# Altium PCB BOARD_2LAYER.PcbDoc (part 2 of 7)
Units mil, origin at the board's own origin, x right, y up, seen from the top; angles counter-clockwise.
Board outline 7677.17 x 7677.17 mil, 2 copper layers (Top Layer, Bottom Layer), stack 34.252 mil thick; 625 components, 375 nets, 1924 pads, 450 vias.
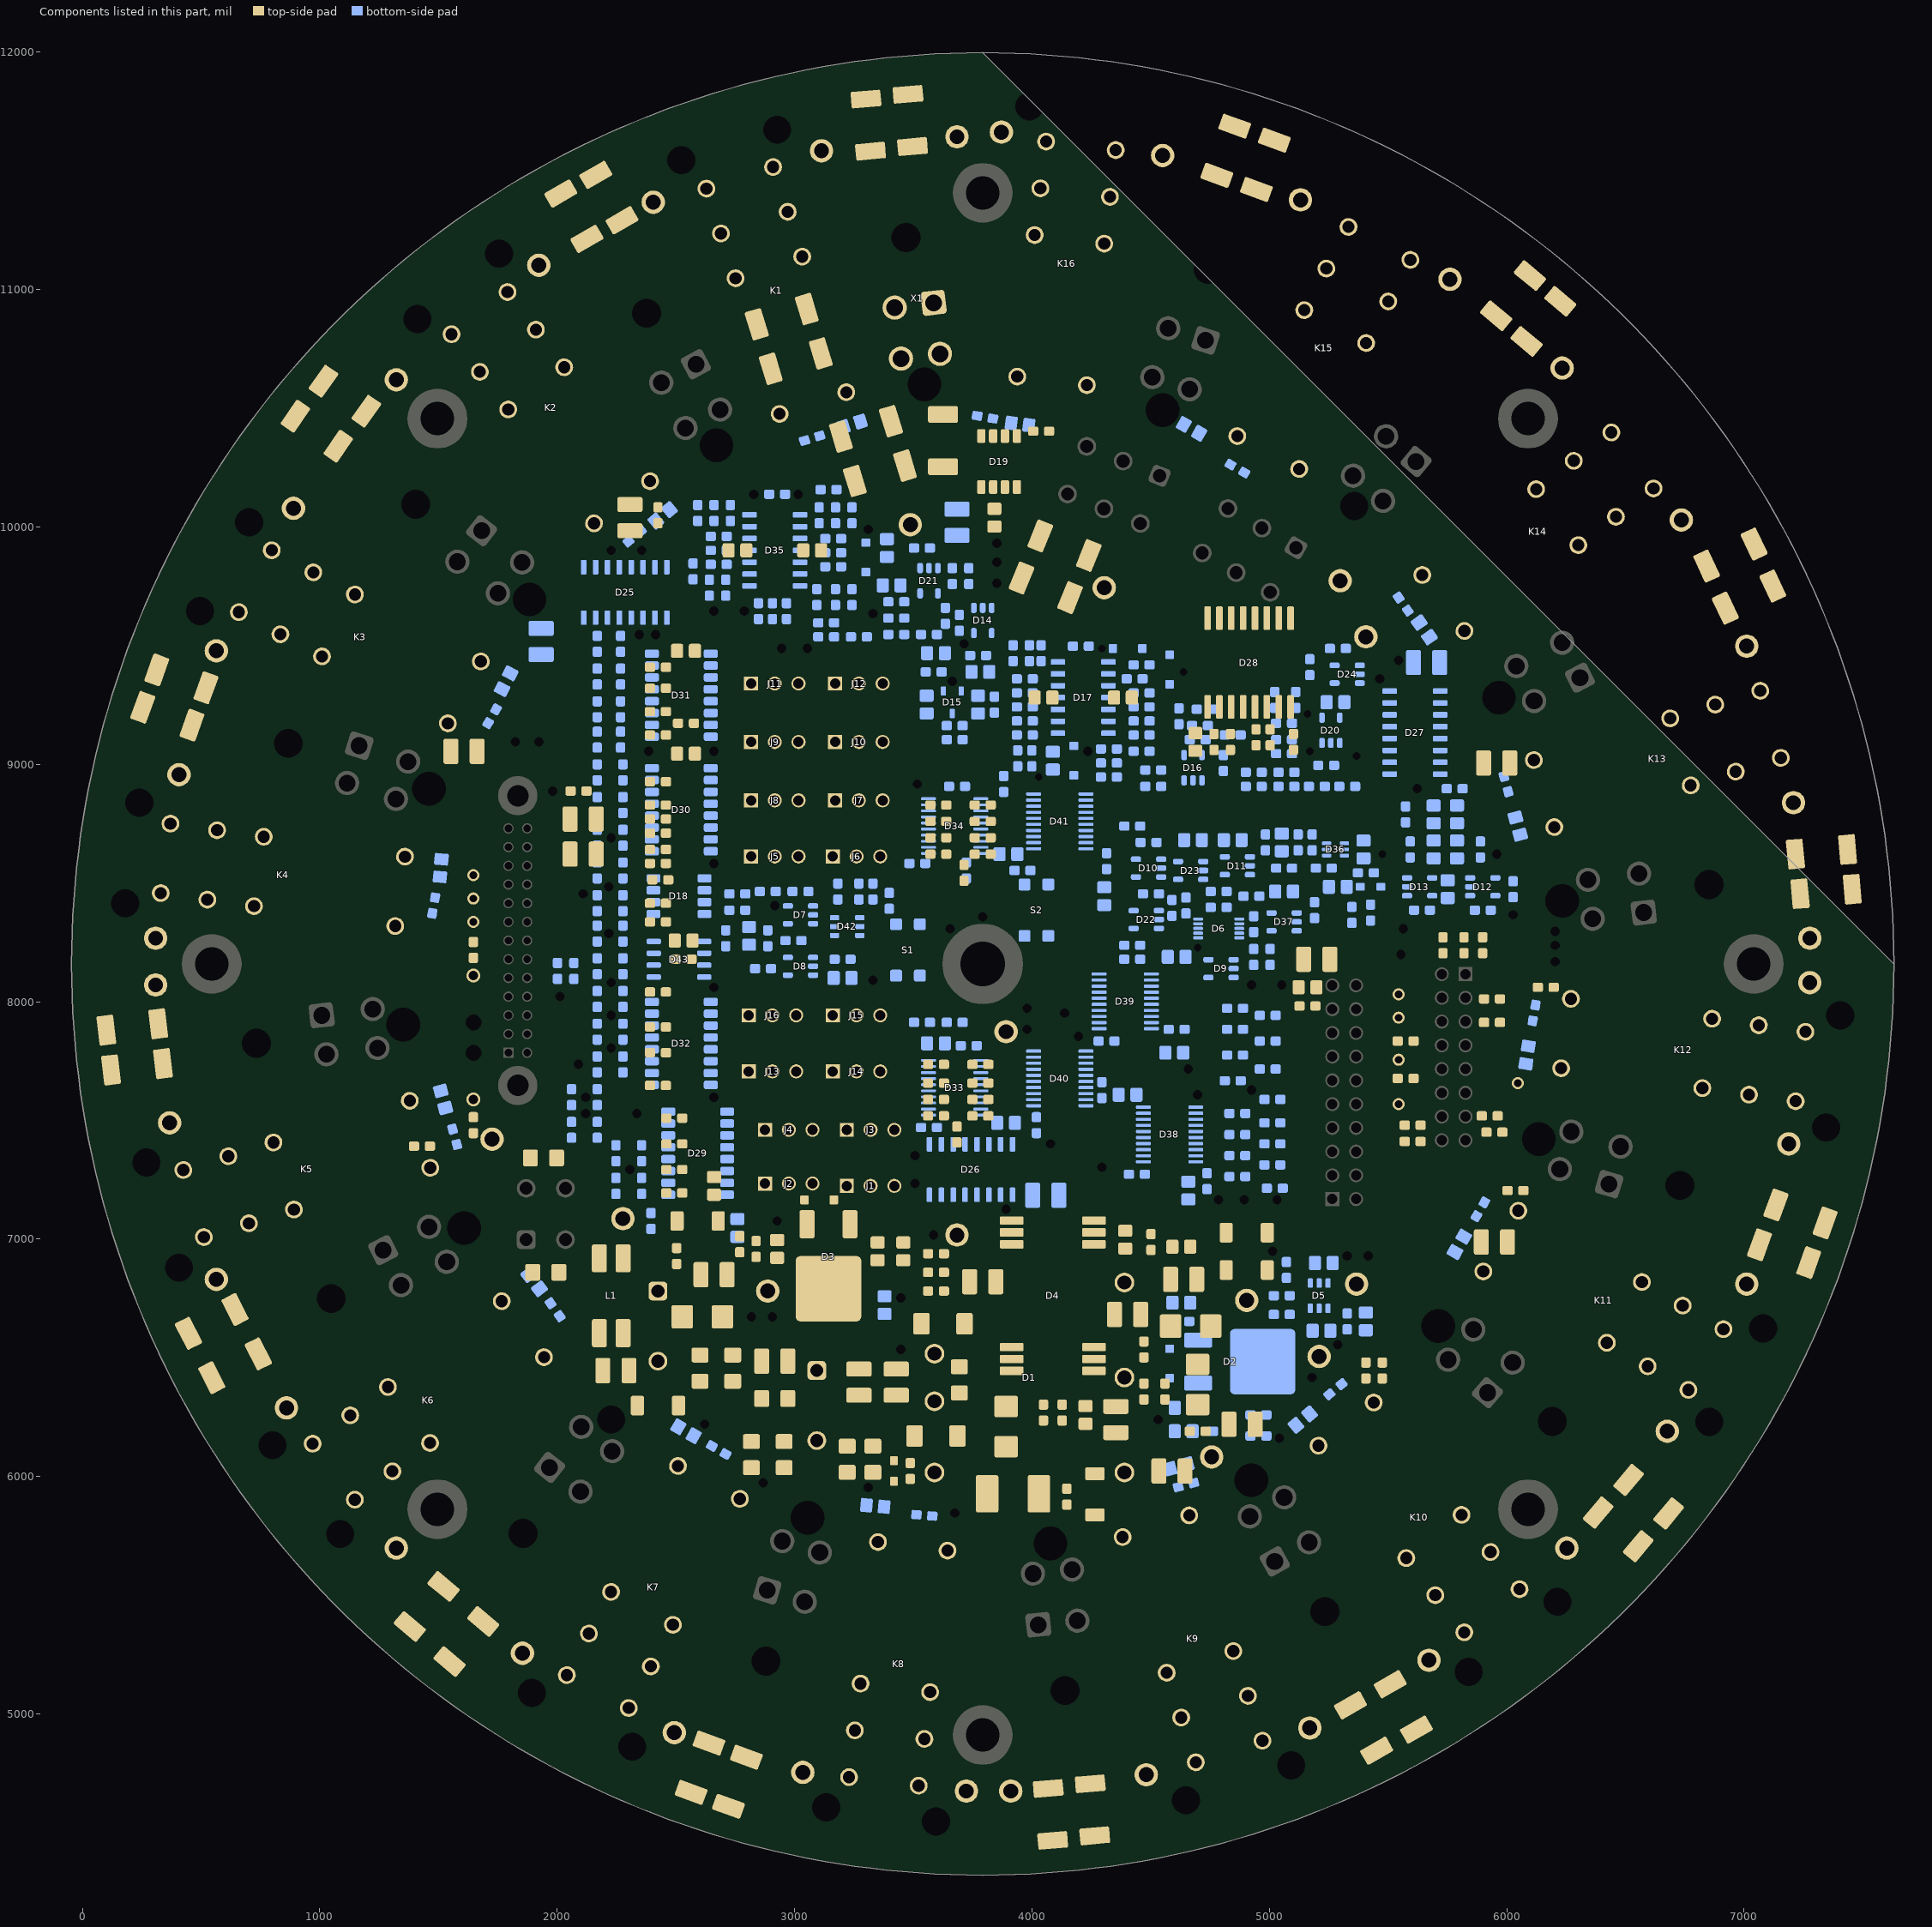
[diagram p2: the components of this part, seen from the top]

## Design rules (kind name [scope] priority, off if disabled: settings) (continued)
PolygonConnect PolygonConnect_In_-U_COM_L02_P091 [IsNamedPolygon('-U_COM_L02_P091')] p98: thpad.connectstyle=Relief thpad.reliefconductorwidth=19.68 thpad.reliefentries=4 thpad.polygonreliefangle="90 Angle" thpad.airgapwidth=19.68 smdpad.connectstyle=Relief smdpad.reliefconductorwidth=9.84 smdpad.reliefentries=4 smdpad.polygonreliefangle="90 Angle" smdpad.airgapwidth=9.84 via.connectstyle=Direct via.reliefconductorwidth=5.12 via.reliefentries=2 via.polygonreliefangle="90 Angle" via.airgapwidth=0
PolygonConnect PolygonConnect_In_$3N7061_L02_P084 [IsNamedPolygon('$3N7061_L02_P084')] p99: thpad.connectstyle=Relief thpad.reliefconductorwidth=19.68 thpad.reliefentries=4 thpad.polygonreliefangle="90 Angle" thpad.airgapwidth=19.68 smdpad.connectstyle=Relief smdpad.reliefconductorwidth=9.84 smdpad.reliefentries=4 smdpad.polygonreliefangle="90 Angle" smdpad.airgapwidth=9.84 via.connectstyle=Direct via.reliefconductorwidth=5.12 via.reliefentries=2 via.polygonreliefangle="90 Angle" via.airgapwidth=0
PolygonConnect PolygonConnect_In_GND_L01_P059 [IsNamedPolygon('GND_L01_P059')] p100: thpad.connectstyle=Relief thpad.reliefconductorwidth=19.68 thpad.reliefentries=4 thpad.polygonreliefangle="90 Angle" thpad.airgapwidth=19.68 smdpad.connectstyle=Relief smdpad.reliefconductorwidth=9.84 smdpad.reliefentries=4 smdpad.polygonreliefangle="90 Angle" smdpad.airgapwidth=9.84 via.connectstyle=Direct via.reliefconductorwidth=5.12 via.reliefentries=2 via.polygonreliefangle="90 Angle" via.airgapwidth=0
PolygonConnect PolygonConnect_In_GND_L01_P057 [IsNamedPolygon('GND_L01_P057')] p101: thpad.connectstyle=Relief thpad.reliefconductorwidth=19.68 thpad.reliefentries=4 thpad.polygonreliefangle="90 Angle" thpad.airgapwidth=19.68 smdpad.connectstyle=Relief smdpad.reliefconductorwidth=9.84 smdpad.reliefentries=4 smdpad.polygonreliefangle="90 Angle" smdpad.airgapwidth=9.84 via.connectstyle=Direct via.reliefconductorwidth=5.12 via.reliefentries=2 via.polygonreliefangle="90 Angle" via.airgapwidth=0
PolygonConnect PolygonConnect_In_-U_COM_L02_P099 [IsNamedPolygon('-U_COM_L02_P099')] p102: thpad.connectstyle=Relief thpad.reliefconductorwidth=19.68 thpad.reliefentries=4 thpad.polygonreliefangle="90 Angle" thpad.airgapwidth=19.68 smdpad.connectstyle=Relief smdpad.reliefconductorwidth=9.84 smdpad.reliefentries=4 smdpad.polygonreliefangle="90 Angle" smdpad.airgapwidth=9.84 via.connectstyle=Direct via.reliefconductorwidth=5.12 via.reliefentries=2 via.polygonreliefangle="90 Angle" via.airgapwidth=0
PolygonConnect PolygonConnect_In_GND_L01_P068 [IsNamedPolygon('GND_L01_P068')] p103: thpad.connectstyle=Relief thpad.reliefconductorwidth=19.68 thpad.reliefentries=4 thpad.polygonreliefangle="90 Angle" thpad.airgapwidth=19.68 smdpad.connectstyle=Relief smdpad.reliefconductorwidth=9.84 smdpad.reliefentries=4 smdpad.polygonreliefangle="90 Angle" smdpad.airgapwidth=9.84 via.connectstyle=Direct via.reliefconductorwidth=5.12 via.reliefentries=2 via.polygonreliefangle="90 Angle" via.airgapwidth=0
PolygonConnect PolygonConnect_In_GND_L01_P069 [IsNamedPolygon('GND_L01_P069')] p104: thpad.connectstyle=Relief thpad.reliefconductorwidth=19.68 thpad.reliefentries=4 thpad.polygonreliefangle="90 Angle" thpad.airgapwidth=19.68 smdpad.connectstyle=Relief smdpad.reliefconductorwidth=9.84 smdpad.reliefentries=4 smdpad.polygonreliefangle="90 Angle" smdpad.airgapwidth=9.84 via.connectstyle=Direct via.reliefconductorwidth=5.12 via.reliefentries=2 via.polygonreliefangle="90 Angle" via.airgapwidth=0
PolygonConnect PolygonConnect_In_GND_L01_P052 [IsNamedPolygon('GND_L01_P052')] p105: thpad.connectstyle=Relief thpad.reliefconductorwidth=19.68 thpad.reliefentries=4 thpad.polygonreliefangle="90 Angle" thpad.airgapwidth=19.68 smdpad.connectstyle=Relief smdpad.reliefconductorwidth=9.84 smdpad.reliefentries=4 smdpad.polygonreliefangle="90 Angle" smdpad.airgapwidth=9.84 via.connectstyle=Direct via.reliefconductorwidth=5.12 via.reliefentries=2 via.polygonreliefangle="90 Angle" via.airgapwidth=0
PolygonConnect PolygonConnect_In_GND_L01_P040 [IsNamedPolygon('GND_L01_P040')] p106: thpad.connectstyle=Relief thpad.reliefconductorwidth=19.68 thpad.reliefentries=4 thpad.polygonreliefangle="90 Angle" thpad.airgapwidth=19.68 smdpad.connectstyle=Relief smdpad.reliefconductorwidth=9.84 smdpad.reliefentries=4 smdpad.polygonreliefangle="90 Angle" smdpad.airgapwidth=9.84 via.connectstyle=Direct via.reliefconductorwidth=5.12 via.reliefentries=2 via.polygonreliefangle="90 Angle" via.airgapwidth=0
PolygonConnect PolygonConnect_In_~IN_COM_L02_P016 [IsNamedPolygon('~IN_COM_L02_P016')] p107: thpad.connectstyle=Relief thpad.reliefconductorwidth=19.68 thpad.reliefentries=4 thpad.polygonreliefangle="90 Angle" thpad.airgapwidth=19.68 smdpad.connectstyle=Relief smdpad.reliefconductorwidth=9.84 smdpad.reliefentries=4 smdpad.polygonreliefangle="90 Angle" smdpad.airgapwidth=9.84 via.connectstyle=Direct via.reliefconductorwidth=5.12 via.reliefentries=2 via.polygonreliefangle="90 Angle" via.airgapwidth=0
PolygonConnect PolygonConnect_In_-U_COM_L02_P100 [IsNamedPolygon('-U_COM_L02_P100')] p108: thpad.connectstyle=Relief thpad.reliefconductorwidth=19.68 thpad.reliefentries=4 thpad.polygonreliefangle="90 Angle" thpad.airgapwidth=19.68 smdpad.connectstyle=Relief smdpad.reliefconductorwidth=9.84 smdpad.reliefentries=4 smdpad.polygonreliefangle="90 Angle" smdpad.airgapwidth=9.84 via.connectstyle=Direct via.reliefconductorwidth=5.12 via.reliefentries=2 via.polygonreliefangle="90 Angle" via.airgapwidth=0
PolygonConnect "PolygonConnect_InClass_\"(Inherited)\"" [InPolygonClass('"(Inherited)"')] p109: thpad.connectstyle=Relief thpad.reliefconductorwidth=19.68 thpad.reliefentries=4 thpad.polygonreliefangle="90 Angle" thpad.airgapwidth=19.68 smdpad.connectstyle=Relief smdpad.reliefconductorwidth=9.84 smdpad.reliefentries=4 smdpad.polygonreliefangle="90 Angle" smdpad.airgapwidth=9.84 via.connectstyle=Direct via.reliefconductorwidth=5.12 via.reliefentries=2 via.polygonreliefangle="90 Angle" via.airgapwidth=0
PolygonConnect [All] p110: thpad.connectstyle=Relief thpad.reliefconductorwidth=19.68 thpad.reliefentries=4 thpad.polygonreliefangle="90 Angle" thpad.airgapwidth=19.68 smdpad.connectstyle=Relief smdpad.reliefconductorwidth=9.84 smdpad.reliefentries=4 smdpad.polygonreliefangle="90 Angle" smdpad.airgapwidth=9.84 via.connectstyle=Direct via.reliefconductorwidth=5.12 via.reliefentries=2 via.polygonreliefangle="90 Angle" via.airgapwidth=0
RoutingVias [All] p1: holewidth=28 width=50 viastyle="Through Hole" minholewidth=28 minwidth=50 maxholewidth=28 maxwidth=50
SolderMaskExpansion [All] p1: expansion=4 istentingtop=FALSE
Width [All] p1: maxlimit=10 minlimit=10 preferedwidth=10
30 further rules are at their usual default settings.

## Classes and differential pairs
polygon class "\"(Inherited)\"": $3N7061_L02_P084 $3N7061_L02_P085 $3N7061_L02_P086 $3N7062_L02_P087 $3N7062_L02_P088 $3N7062_L02_P089 $3N7062_L02_P090 +U_COM_L02_P104 +U_COM_L02_P105 +U_COM_L02_P106 +U_COM_L02_P107 -U_COM_L02_P091 -U_COM_L02_P092 -U_COM_L02_P093 -U_COM_L02_P094 -U_COM_L02_P095 -U_COM_L02_P096 -U_COM_L02_P097 -U_COM_L02_P098 -U_COM_L02_P099 -U_COM_L02_P100 -U_COM_L02_P101 -U_COM_L02_P102 -U_COM_L02_P103 GND_L01_P021 GND_L01_P023 GND_L01_P024 GND_L01_P025 GND_L01_P026 GND_L01_P027 GND_L01_P028 GND_L01_P029 GND_L01_P030 GND_L01_P034 GND_L01_P035 GND_L01_P036 GND_L01_P037 GND_L01_P038 GND_L01_P039 GND_L01_P040 GND_L01_P041 GND_L01_P042 GND_L01_P043 GND_L01_P045 GND_L01_P046 GND_L01_P049 GND_L01_P052 GND_L01_P053 GND_L01_P054 GND_L01_P055 GND_L01_P056 GND_L01_P057 GND_L01_P058 GND_L01_P059 GND_L01_P060 GND_L01_P061 GND_L01_P062 GND_L01_P063 GND_L01_P064 GND_L01_P065 GND_L01_P066 GND_L01_P067 GND_L01_P068 GND_L01_P069 GND_L01_P070 GND_L01_P071 GND_L01_P072 GND_L01_P073 GND_L01_P074 GND_L01_P075 GND_L01_P076 GND_L01_P077 GND_L01_P078 GND_L01_P079 GND_L01_P080 GND_L01_P081 GND_L01_P082 GND_L01_P083 GND_L02_P022 GND_L02_P031 GND_L02_P032 GND_L02_P033 GND_L02_P044 GND_L02_P047 GND_L02_P048 GND_L02_P050 GND_L02_P051 IN_COM_L01_P014 IN_COM_L01_P015 IN_COM_L02_P013 OUT_L01_P006 OUT_L01_P007 OUT_L01_P010 OUT_L01_P011 OUT_L01_P012 OUT_L02_P008 OUT_L02_P009 ~IN_COM_L01_P017 ~IN_COM_L01_P019 ~IN_COM_L02_P016 ~IN_COM_L02_P018 ~IN_COM_L02_P020 ~OUT_L01_P001 ~OUT_L01_P002 ~OUT_L01_P003 ~OUT_L01_P004 ~OUT_L01_P005 ~OUT_L02_P000

## Components (designator, comment, footprint, x,y, rotation, side; value= is the part's Value field where it differs from the comment)
C1 "CL10B104KB8SFNC" 0603-STANDART-1608 2709.79,8267.72 r270 bottom
C2 "CL10B104KB8SFNC" 0603-STANDART-1608 2867.27,8139.76 r0 bottom
C3 "CL10B104KB8SFNC" 0603-STANDART-1608 2886.95,8464.57 r0 bottom
C4 "CL10B104KB8SFNC" 0603-STANDART-1608 3723.57,8553.15 r90 bottom locked
C5 "CL10B104KB8SFNC" 0603-STANDART-1608 3684.2,7440.94 r90 top
C6 "CL10B104KB8SFNC" 0603-STANDART-1608 3684.2,8907.48 r0 bottom locked
C7 "CL10B104KB8SFNC" 0603-STANDART-1608 3713.72,8543.31 r90 top
C8 "CL10B104KB8SFNC" 0603-STANDART-1608 5475.53,6446.85 r270 top
C9 "CL10B104KB8SFNC" 0603-STANDART-1608 4146.79,5915.35 r270 top
C10 "CL10B104KB8SFNC" 0603-STANDART-1608 4953.88,6259.84 r180 bottom
C11 "CL10B104KB8SFNC" 0603-STANDART-1608 4629.08,6653.54 r0 bottom
C12 "CL10B104KB8SFNC" 0603-STANDART-1608 3595.61,6860.24 r0 top
C13 "CL10B104KB8SFNC" 0603-STANDART-1608 4501.13,6988.19 r90 top
C14 "CL10B104KB8SFNC" 0603-STANDART-1608 4127.11,6269.69 r90 top
C15 "CL10B104KB8SFNC" 0603-STANDART-1608 2837.74,6958.66 r270 top
C16 "CL10B104KB8SFNC" 0603-STANDART-1608 5052.31,6683.07 r0 bottom
C17 "CL10B104KB8SFNC" 0603-STANDART-1608 5327.9,6653.54 r90 bottom
C18 "CL10B104KB8SFNC" 0603-STANDART-1608 4471.6,6535.43 r90 top
C19 "CL10B104KB8SFNC" 0603-STANDART-1608 2532.62,8179.13 r180 top
C20 "CL10B104KB8SFNC" 0603-STANDART-1608 2542.46,9173.23 r180 top
C21 "CL10B104KB8SFNC" 0603-STANDART-1608 1430.26,7391.73 r180 top
C22 "CL10B104KB8SFNC" 0603-STANDART-1608 2424.35,10049.21 r90 top
C23 "CL10B104KB8SFNC" 0603-STANDART-1608 6164.51,8061.02 r0 top
C24 "CL10B104KB8SFNC" 0603-STANDART-1608 6036.56,7204.72 r0 top
C25 "CL10B104KB8SFNC" 0603-STANDART-1608 2424.35,8710.63 r180 top
C26 "CL10B104KB8SFNC" 0603-STANDART-1608 2434.2,8513.78 r180 top
C27 "CL10B104KB8SFNC" 0603-STANDART-1608 2768.84,6978.35 r270 top
C28 "CL10B104KB8SFNC" 0603-STANDART-1608 3841.68,9251.97 r270 bottom
C29 "CL10B104KB8SFNC" 0603-STANDART-1608 4934.2,8326.77 r270 bottom
C30 "CL10B104KB8SFNC" 0603-STANDART-1608 4422.39,8740.16 r0 bottom
C31 "CL10B104KB8SFNC" 0603-STANDART-1608 5406.64,8543.31 r180 bottom
C32 "CL10B104KB8SFNC" 0603-STANDART-1608 4501.13,8454.72 r180 bottom
C33 "CL10B104KB8SFNC" 0603-STANDART-1608 6026.72,8474.41 r270 bottom
C34 "CL10B104KB8SFNC" 0603-STANDART-1608 4697.98,6190.94 r0 top
C35 "CL10B104KB8SFNC" 0603-STANDART-1608 5160.57,7982.28 r0 top
C36 "CL10B104KB8SFNC" 0603-STANDART-1608 4461.76,9242.13 r180 bottom
C37 "CL10B104KB8SFNC" 0603-STANDART-1608 3969.63,9242.13 r0 bottom
C38 "CL10B104KB8SFNC" 0603-STANDART-1608 4766.87,9094.49 r90 top
C39 "CL10B104KB8SFNC" 0603-STANDART-1608 3162.54,9891.73 r180 bottom
C40 "CL10B104KB8SFNC" 0603-STANDART-1608 2680.26,9901.57 r0 bottom
C41 "CL10B104KB8SFNC" 0603-STANDART-1608 5170.42,9409.45 r90 bottom
C42 "CL10B104KB8SFNC" 0603-STANDART-1608 3634.98,9625.98 r270 bottom
C43 "CL10B104KB8SFNC" 0603-STANDART-1608 4806.24,9005.91 r90 bottom
C44 "CL10B104KB8SFNC" 0603-STANDART-1608 4510.97,8976.38 r0 bottom
C45 "CL21B225KOFNNNE" 0805-STANDART-2012 3201.91,8100.39 r0 bottom
C46 "CL21B225KOFNNNE" 0805-STANDART-2012 3595.61,7824.8 r0 bottom
C47 "CL21B225KOFNNNE" 0805-STANDART-2012 4304.27,8444.88 r90 bottom
C48 "CL21B225KOFNNNE" 0805-STANDART-2012 4402.7,7608.27 r180 bottom
C49 "CL21B225KOFNNNE" 0805-STANDART-2012 4629.08,6968.5 r180 top
C50 "CL21B225KOFNNNE" 0805-STANDART-2012 4629.08,6732.28 r0 bottom
C51 "CL21B225KOFNNNE" 0805-STANDART-2012 4638.92,6289.37 r0 bottom
C52 "CL21B225KOFNNNE" 0805-STANDART-2012 2926.32,6958.66 r270 top
C53 "CL21B225KOFNNNE" 0805-STANDART-2012 3457.82,6948.82 r90 top
C54 "CL21B225KOFNNNE" 0805-STANDART-2012 4225.53,6259.84 r90 top
C55 "CL21B225KOFNNNE" 0805-STANDART-2012 4392.86,6998.03 r90 top
C56 "CL21B225KOFNNNE" 0805-STANDART-2012 2660.57,7224.41 r90 top
C57 "CL21B225KOFNNNE" 0805-STANDART-2012 2542.46,9045.28 r180 top
C58 "CL21B225KOFNNNE" 0805-STANDART-2012 3772.78,9251.97 r270 bottom
C59 "CL21B225KOFNNNE" 0805-STANDART-2012 4845.61,8681.1 r0 bottom
C60 "CL21B225KOFNNNE" 0805-STANDART-2012 5062.15,8464.57 r180 bottom
C61 "CL21B225KOFNNNE" 0805-STANDART-2012 5751.13,8474.41 r270 bottom
C62 "CL21B225KOFNNNE" 0805-STANDART-2012 4599.55,7785.43 r0 bottom
C63 "CL21B225KOFNNNE" 0805-STANDART-2012 4658.61,7204.72 r270 bottom
C64 "C1808X102KHRACTU" 1808-STANDART-4520 3625.14,6643.7 r180 top
C65 "C1808X102KHRACTU" 1808-STANDART-4520 3595.61,6171.26 r180 top
C66 "C1206C104K1RACTU" 1206-STANDART-3216 1942.07,7342.52 r180 top
C67 "C1206C104K1RACTU" 1206-STANDART-3216 2601.52,6456.69 r90 top
C68 "C1206C104K1RACTU" 1206-STANDART-3216 2739.31,6456.69 r90 top
C69 "C1206C104K1RACTU" 1206-STANDART-3216 3694.04,6407.48 r90 top
C70 "CL32B475KCVZW6E" 1210-STANDART-3225 3428.29,6397.64 r90 top
C71 "CL32B475KCVZW6E" 1210-STANDART-3225 3270.81,6397.64 r90 top
C72 "CL21B106KOQNNNE" 0805-STANDART-2012 2808.21,8277.56 r90 bottom
C73 "CL21B106KOQNNNE" 0805-STANDART-2012 3890.89,7490.16 r0 bottom
C74 "CL21B106KOQNNNE" 0805-STANDART-2012 3900.73,8622.05 r0 bottom locked
C75 "CL21B106KOQNNNE" 0805-STANDART-2012 4638.92,6190.94 r180 bottom
C76 "CL21B106KOQNNNE" 0805-STANDART-2012 3349.55,6948.82 r270 top
C77 "CL21B106KOQNNNE" 0805-STANDART-2012 5219.63,6614.17 r0 bottom
C78 "CL21B106KOQNNNE" 0805-STANDART-2012 5406.64,6653.54 r270 bottom
C79 "CL21B106KOQNNNE" 0805-STANDART-2012 2542.46,9478.35 r0 top
C80 "CL21B106KOQNNNE" 0805-STANDART-2012 2532.62,8257.87 r0 top
C81 "CL21B106KOQNNNE" 0805-STANDART-2012 3782.62,9389.76 r0 bottom
C82 "CL21B106KOQNNNE" 0805-STANDART-2012 3595.61,9468.5 r180 bottom
C83 "CL21B106KOQNNNE" 0805-STANDART-2012 3556.24,9251.97 r270 bottom
C84 "CL21B106KOQNNNE" 0805-STANDART-2012 4609.39,8188.98 r180 bottom
C85 "CL21B106KOQNNNE" 0805-STANDART-2012 4678.29,8681.1 r0 bottom
C86 "CL21B106KOQNNNE" 0805-STANDART-2012 5160.57,8061.02 r180 top
C87 "CL21B106KOQNNNE" 0805-STANDART-2012 4048.37,9281.5 r180 top
C88 "CL21B106KOQNNNE" 0805-STANDART-2012 4383.01,9281.5 r0 top
C89 "CL21B106KOQNNNE" 0805-STANDART-2012 4688.13,9094.49 r270 top
C90 "CL21B106KOQNNNE" 0805-STANDART-2012 2759,9901.57 r180 top
C91 "CL21B106KOQNNNE" 0805-STANDART-2012 3841.68,10039.37 r270 top
C92 "CL21B106KOQNNNE" 0805-STANDART-2012 5278.68,9261.81 r180 bottom
C93 "CL21B106KOQNNNE" 0805-STANDART-2012 3408.61,9753.94 r180 bottom
C94 "CL21B106KOQNNNE" 0805-STANDART-2012 3073.96,9901.57 r0 top
C95 "GRM32DR71E106KA12L" 1210-STANDART-3225 1932.23,9517.72 r90 bottom
C96 "GRM32DR71E106KA12L" 1210-STANDART-3225 2306.24,10039.37 r90 top
C97 "GRM32DR71E106KA12L" 1210-STANDART-3225 5662.54,9429.13 r180 bottom
C98 "GRM32DR71E106KA12L" 1210-STANDART-3225 4353.49,6240.16 r90 top
C99 "GRM32DR71E106KA12L" 1210-STANDART-3225 4638.92,6830.71 r180 top
C100 "GRM32DR71E106KA12L" 1210-STANDART-3225 5947.98,6988.19 r0 top
C101 "GRM32DR71E106KA12L" 1210-STANDART-3225 5957.82,9005.91 r0 top
C102 "GRM32DR71E106KA12L" 1210-STANDART-3225 1607.42,9055.12 r180 top
C103 "GRM32DR71E106KA12L" 1210-STANDART-3225 4058.21,7185.04 r180 bottom
C104 "CC0805KKX7R7BB105" 0805-STANDART-2012 5229.47,6899.61 r180 bottom
C105 "GRM1885C1H100JA01D" 0603-STANDART-1608 3940.1,9025.59 r270 bottom
C106 "GRM1885C1H100JA01D" 0603-STANDART-1608 3172.39,9704.72 r270 bottom
C107 "CL10C010BB8NNNC" 0603-STANDART-1608 3989.31,9468.5 r90 bottom
C108 "CL10C010BB8NNNC" 0603-STANDART-1608 3969.63,9301.18 r0 bottom
C109 "CL10C010BB8NNNC" 0603-STANDART-1608 4697.98,9104.33 r0 bottom
C110 "CL10C010BB8NNNC" 0603-STANDART-1608 4727.5,9232.28 r0 bottom
C111 "CL10C010BB8NNNC" 0603-STANDART-1608 4323.96,9064.96 r180 bottom
C112 "CL10C010BB8NNNC" 0603-STANDART-1608 2660.57,10059.06 r90 bottom
C113 "CL10C010BB8NNNC" 0603-STANDART-1608 2640.89,9744.09 r270 bottom
C114 "CL10C010BB8NNNC" 0603-STANDART-1608 3241.28,10049.21 r90 bottom
C115 "CL10C010BB8NNNC" 0603-STANDART-1608 3103.49,10049.21 r90 bottom
C116 "CL10C010BB8NNNC" 0603-STANDART-1608 4038.53,10403.54 r0 top
C117 "GRM1885C1H102JA01D" 0603-STANDART-1608 2247.19,7224.41 r90 bottom
C118 "GRM1885C1H102JA01D" 0603-STANDART-1608 2247.19,7362.2 r90 bottom
C119 "GRM1885C1H102JA01D" 0603-STANDART-1608 2060.18,7460.63 r90 bottom
C120 "GRM1885C1H102JA01D" 0603-STANDART-1608 2060.18,7598.43 r90 bottom
C121 "GRM1885C1H102JA01D" 0603-STANDART-1608 2168.45,8553.15 r90 bottom
C122 "GRM1885C1H102JA01D" 0603-STANDART-1608 2168.45,8690.94 r90 bottom
C123 "GRM1885C1H102JA01D" 0603-STANDART-1608 2168.45,8828.74 r90 bottom
C124 "GRM1885C1H102JA01D" 0603-STANDART-1608 2168.45,8966.54 r90 bottom
C125 "GRM1885C1H102JA01D" 0603-STANDART-1608 2168.45,9104.33 r90 bottom
C126 "GRM1885C1H102JA01D" 0603-STANDART-1608 2168.45,9232.28 r90 bottom
C127 "GRM1885C1H102JA01D" 0603-STANDART-1608 2266.87,9370.08 r90 bottom
C128 "GRM1885C1H102JA01D" 0603-STANDART-1608 2266.87,9507.87 r90 bottom
C129 "GRM1885C1H102JA01D" 0603-STANDART-1608 2168.45,7736.22 r90 bottom
C130 "GRM1885C1H102JA01D" 0603-STANDART-1608 2168.45,7874.02 r90 bottom
C131 "GRM1885C1H102JA01D" 0603-STANDART-1608 2168.45,8011.81 r90 bottom
C132 "GRM1885C1H102JA01D" 0603-STANDART-1608 2168.45,8149.61 r90 bottom
C133 "GRM1885C1H102JA01D" 0603-STANDART-1608 2168.45,8287.4 r90 bottom
C134 "GRM1885C1H102JA01D" 0603-STANDART-1608 2168.45,8415.35 r90 bottom
C135 "GRM1885C1H102JA01D" 0603-STANDART-1608 5121.2,8671.26 r90 bottom
C136 "GRM1885C1H102JA01D" 0603-STANDART-1608 4944.04,9114.17 r270 top
C137 "GRM1885C1H102JA01D" 0603-STANDART-1608 5022.78,9271.65 r90 bottom
C138 "GRM1885C1H102JA01D" 0603-STANDART-1608 3428.29,9616.14 r180 bottom
C139 "C0805C822K5RACTU" 0805-STANDART-2012 4087.74,9015.75 r90 bottom
C140 "C0805C822K5RACTU" 0805-STANDART-2012 3388.92,9911.42 r270 bottom
C141 "GRM2165C1H222JA01D" 0805-STANDART-2012 5396.79,8641.73 r90 bottom
C142 "UHE1H102MHD6_1" CAP-EL-L7.5-D18,0 3093.64,6299.21 r270 bottom locked
C143 "UHE1H102MHD6_1" CAP-EL-L7.5-D18,0 2424.35,6633.86 r270 bottom locked
D1 "PDQ10-Q48-S5-D" THN-30 3989.31,6417.32 r0 bottom locked
D2 "NCP5501DT50RKG" DPAK-3-TO252-ONSEMI 4699.94,6484.25 r90 bottom locked
D3 "NCP5501DT50RKG" DPAK-3-TO252-ONSEMI 3142.86,7062.99 r180 top locked
D4 "DCP020507U" DVB-R-PDSO-G12/G28 4087.74,6761.81 r90 top locked
D5 "LM2776DBVR" DBV_R-PDSO-G6 5209.79,6761.81 r180 bottom
D6 "ADG736BRMZ-REEL7" MSOP-RM-10-AD 4786.56,8309.06 r90 bottom
D7 "SN74LVC1G08DBVR" SOT-23-DBV-R-PDSO-G5-TI 3024.75,8366.14 r270 bottom
D8 "SN74LVC1G08DBVR" SOT-23-DBV-R-PDSO-G5-TI 3024.75,8149.61 r270 bottom
D9 "SN74LVC1G08DBVR" SOT-23-DBV-R-PDSO-G5-TI 4796.4,8139.76 r270 bottom
D10 "SN74LVC1G08DBVR" SOT-23-DBV-R-PDSO-G5-TI 4491.28,8562.99 r270 bottom
D11 "SN74LVC1G08DBVR" SOT-23-DBV-R-PDSO-G5-TI 4865.3,8572.83 r270 bottom
D12 "SN74LVC1G08DBVR" SOT-23-DBV-R-PDSO-G5-TI 5898.76,8484.25 r90 bottom
D13 "SN74LVC1G08DBVR" SOT-23-DBV-R-PDSO-G5-TI 5633.01,8484.25 r90 bottom
D14 "SN74LVC1G08DBVR" SOT-23-DBV-R-PDSO-G5-TI 3792.46,9606.3 r0 bottom
D15 "AD1582BRTZ-REEL7" SOT-23-RT-3-AD 3664.51,9261.81 r0 bottom
D16 "LMH6642MF/NOPB" SOT-23-DBV-R-PDSO-G5-TI 4678.29,8986.22 r180 bottom
D17 "LMH6644MAX/NOPB" D_R_PDSO_G14 4215.69,9281.5 r270 bottom locked
D18 "MOCD207R2M" 8-SOIC-VISHAY 2512.94,8444.88 r90 bottom locked
D19 "MOCD207R2M" 8-SOIC-VISHAY 3861.36,10275.59 r180 top locked
D20 "TLV3701QDBVRG4Q1" SOT-23-DBV-R-PDSO-G5-TI 5259,9143.7 r180 bottom
D21 "TLV3701QDBVRG4Q1" SOT-23-DBV-R-PDSO-G5-TI 3566.09,9773.62 r0 bottom
D22 "SN74AHCT1G00DBVR" SOT-23-DBV-R-PDSO-G5-TI 4481.44,8346.46 r270 bottom
D23 "SN74AHCT1G00DBVR" SOT-23-DBV-R-PDSO-G5-TI 4668.45,8553.15 r270 bottom
D24 "SN74AHCT1G00DBVR" SOT-23-DBV-R-PDSO-G5-TI 5327.9,9379.92 r270 bottom
D25 "ULN2003ADR" D_R_PDSO-G16 2286.56,9724.41 r180 bottom locked
D26 "ULN2003ADR" D_R_PDSO-G16 3743.25,7293.31 r0 bottom locked
D27 "ULN2003ADR" D_R_PDSO-G16 5613.33,9133.86 r90 bottom locked
D28 "ACS724KMATR-65AB-T" 16-SOIC-7mm5W-Allegro 4914.51,9429.13 r180 top locked
D29 "ACPL-247-500E" 16-SOIC-VISHAY 2591.68,7362.2 r90 bottom locked
D30 "ACPL-247-500E" 16-SOIC-VISHAY 2522.78,8809.06 r90 bottom locked
D31 "ACPL-247-500E" 16-SOIC-VISHAY 2522.78,9291.34 r90 bottom locked
D32 "ACPL-247-500E" 16-SOIC-VISHAY 2522.78,7824.8 r90 bottom locked
D33 "SN74AHC574PWR" PW-R-PDSO-G20-TI 3674.35,7637.8 r90 bottom locked
D34 "SN74AHC574PWR" PW-R-PDSO-G20-TI 3674.35,8740.16 r90 bottom locked
D35 "LMH6644MAX/NOPB_1" D_R_PDSO_G14 2916.48,9901.57 r270 bottom locked
D36 "ADM1087AKSZ-REEL7" SC-70-KS-6-AD 5278.68,8641.73 r90 bottom
D37 "SN74LVC1G00DBVR" SOT-23-DBV-R-PDSO-G5-TI 5062.15,8336.61 r270 bottom
D38 "SN74ABT245BNSR" PW-R-PDSO-G20 4579.87,7440.94 r90 bottom locked
D39 "SN74ABT245BNSR" PW-R-PDSO-G20 4392.86,8001.97 r90 bottom locked
D40 "SN74ABT640PWR" PW-R-PDSO-G20 4117.27,7677.17 r90 bottom locked
D41 "SN74ABT640PWR" PW-R-PDSO-G20 4117.27,8759.84 r90 bottom locked
D42 "SN74LVC1G27DBVR" DBV_R-PDSO-G6 3221.6,8316.93 r270 bottom
D43 "SI8620EC-B-IS" SOIC-8-SIL-LAB-NB 2513.03,8179.23 r270 bottom locked
FB1 "MMZ1608S102A" 0603-STANDART-1608 4422.39,8238.19 r0 bottom
FB2 "MMZ1608S102A" 0603-STANDART-1608 4796.4,6190.94 r180 bottom
FB3 "MMZ1608S102A" 0603-STANDART-1608 3595.61,6938.98 r180 top
FB4 "MMZ1608S102A" 0603-STANDART-1608 5052.31,6761.81 r0 bottom
FB5 "MMZ1608S102A" 0603-STANDART-1608 2503.09,6929.13 r90 top
FB6 "MMZ1608S102A" 0603-STANDART-1608 2424.35,8641.73 r180 top
FB7 "MMZ1608S102A" 0603-STANDART-1608 4422.39,8179.13 r180 bottom
FB8 "MMZ1608A182B" 0603-STANDART-1608 3536.56,7913.39 r0 bottom
FB9 "MMZ1608A182B" 0603-STANDART-1608 2886.95,8267.72 r270 bottom
FB10 "MMZ1608A182B" 0603-STANDART-1608 3674.35,9104.33 r180 bottom
FB11 "MMZ1608A182B" 0603-STANDART-1608 4924.35,8444.88 r180 bottom
FB12 "MMZ1608A182B" 0603-STANDART-1608 5426.32,8375.98 r270 bottom
FB13 "MMZ1608A182B" 0603-STANDART-1608 5071.99,8966.54 r180 bottom
FB14 "MMZ1608A182B" 0603-STANDART-1608 5071.99,8907.48 r180 bottom
FB15 "MMZ1608A182B" 0603-STANDART-1608 3133.01,9596.46 r180 bottom
FB16 "MMZ1608A182B" 0603-STANDART-1608 3133.01,9537.4 r180 bottom
FB17 "MMZ1608A182B" 0603-STANDART-1608 5199.94,8907.48 r0 bottom
FB18 "MMZ1608A182B" 0603-STANDART-1608 3270.81,9537.4 r0 bottom
H1 "APT2012CGCK" 0805-STANDART-2012-SVET 3379.08,6722.44 r270 bottom
H2 "APT2012CGCK" 0805-STANDART-2012-SVET 5790.5,8789.37 r90 bottom
H3 "APT2012CGCK" 0805-STANDART-2012-SVET 5692.07,8789.37 r270 bottom
H4 "APT2012CGCK" 0805-STANDART-2012-SVET 2759,7047.24 r90 bottom
H5 "APT2012SRCPRV" 0805-STANDART-2012-SVET 3241.28,10433.07 r17.5 bottom
H6 "APT2012SRCPRV" 0805-STANDART-2012-SVET 2444.04,10049.21 r40 bottom
H7 "APT2012SRCPRV" 0805-STANDART-2012-SVET 1784.59,9350.39 r62.5 bottom
H8 "APT2012SRCPRV" 0805-STANDART-2012-SVET 1509,8562.99 r85 bottom
H9 "APT2012SRCPRV" 0805-STANDART-2012-SVET 1518.84,7588.58 r105 bottom
H10 "APT2012SRCPRV" 0805-STANDART-2012-SVET 1902.7,6820.87 r127 bottom
H11 "APT2012SRCPRV" 0805-STANDART-2012-SVET 2542.46,6190.94 r150 bottom
H12 "APT2012SRCPRV" 0805-STANDART-2012-SVET 3339.71,5875.98 r175 bottom
H13 "APT2012SRCPRV" 0805-STANDART-2012-SVET 4619.24,6043.31 r195 bottom
H14 "APT2012SRCPRV" 0805-STANDART-2012-SVET 5140.89,6240.16 r220 bottom
H15 "APT2012SRCPRV" 0805-STANDART-2012-SVET 5800.34,6978.35 r240 bottom
H16 "APT2012SRCPRV" 0805-STANDART-2012-SVET 6085.77,7775.59 r262 bottom
H17 "APT2012SRCPRV" 0805-STANDART-2012-SVET 6046.4,8740.16 r285 bottom
H18 "APT2012SRCPRV" 0805-STANDART-2012-SVET 5652.7,9566.93 r305 bottom
H19 "APT2012SRCPRV" 0805-STANDART-2012-SVET 4671.97,10413.39 r150 bottom
H20 "APT2012SRCPRV" 0805-STANDART-2012-SVET 3949.94,10433.07 r353 bottom
H21 "APT2012SRCPRV" 0805-STANDART-2012-SVET 5790.5,8641.73 r90 bottom
H22 "QBLP631-IW" 0805-STANDART-2012-SVET 5692.07,8641.73 r90 bottom
J1 "SPC02SVJN-RC-3POS" PLS-3-2,54 3320.02,7224.41 r0 bottom
J2 "SPC02SVJN-RC-3POS" PLS-3-2,54 2975.53,7234.25 r0 bottom
J3 "SPC02SVJN-RC-3POS" PLS-3-2,54 3320.02,7460.63 r0 bottom
J4 "SPC02SVJN-RC-3POS" PLS-3-2,54 2975.53,7460.63 r0 bottom
J5 "SPC02SVJN-RC-3POS" PLS-3-2,54 2916.48,8612.2 r0 bottom
J6 "SPC02SVJN-RC-3POS" PLS-3-2,54 3260.97,8612.2 r0 bottom
J7 "SPC02SVJN-RC-3POS" PLS-3-2,54 3270.81,8848.43 r0 bottom
J8 "SPC02SVJN-RC-3POS" PLS-3-2,54 2916.48,8848.43 r0 bottom
J9 "SPC02SVJN-RC-3POS" PLS-3-2,54 2916.48,9094.49 r0 bottom
J10 "SPC02SVJN-RC-3POS" PLS-3-2,54 3270.81,9094.49 r0 bottom
J11 "SPC02SVJN-RC-3POS" PLS-3-2,54 2916.48,9340.55 r0 bottom
J12 "SPC02SVJN-RC-3POS" PLS-3-2,54 3270.81,9340.55 r0 bottom
J13 "SPC02SVJN-RC-3POS" PLS-3-2,54 2906.64,7706.69 r0 bottom
J14 "SPC02SVJN-RC-3POS" PLS-3-2,54 3260.97,7706.69 r0 bottom
J15 "SPC02SVJN-RC-3POS" PLS-3-2,54 3260.97,7942.91 r0 bottom
J16 "SPC02SVJN-RC-3POS" PLS-3-2,54 2906.64,7942.91 r0 bottom
K1 "RT314005" RT-2-TE-YNIVERSAL 2922.26,10999.09 r108 bottom locked
K2 "RT314005" RT-2-TE-YNIVERSAL 1971.17,10504.72 r127 bottom locked
K3 "RT314005" RT-2-TE-YNIVERSAL 1165.84,9538.73 r152 bottom locked
K4 "RT314005" RT-2-TE-YNIVERSAL 841.36,8535.11 r172 bottom locked
K5 "RT314005" RT-2-TE-YNIVERSAL 942.46,7295.19 r197 bottom locked
K6 "RT314005" RT-2-TE-YNIVERSAL 1454.69,6319.12 r217 bottom locked
K7 "RT314005" RT-2-TE-YNIVERSAL 2403.66,5532.5 r242 bottom locked
K8 "RT314005" RT-2-TE-YNIVERSAL 3436.49,5208.34 r263 bottom locked
K9 "RT314005" RT-2-TE-YNIVERSAL 4677.18,5313.85 r288 bottom locked
K10 "RT314005" RT-2-TE-YNIVERSAL 5632.09,5825.81 r308 bottom locked
K11 "RT314005" RT-2-TE-YNIVERSAL 6409.57,6741.12 r330 bottom locked
K12 "RT314005" RT-2-TE-YNIVERSAL 6746.43,7796.38 r352 bottom locked
K13 "RT314005" RT-2-TE-YNIVERSAL 6636.95,9023.71 r17 bottom locked
K14 "RT314005" RT-2-TE-YNIVERSAL 6133.46,9981.84 r37 bottom locked
K15 "RT314005" RT-2-TE-YNIVERSAL 5230.8,10756.54 r62 bottom locked
K16 "RT314005" RT-2-TE-YNIVERSAL 4145.69,11113.31 r83 bottom locked
KW1 "MGSHV-0_12-D1_3xd0.45" MGSHV-0_12-D1_3xd0_45 1646.79,8336.61 r0 top
KW2 "MGSHV-0_12-D1_3xd0.45" MGSHV-0_12-D1_3xd0_45 1646.79,8435.04 r0 top
KW3 "MGSHV-0_12-D1_3xd0.45" MGSHV-0_12-D1_3xd0_45 1646.79,8533.46 r0 top
KW4 "MGSHV-0_12-D1_3xd0.45" MGSHV-0_12-D1_3xd0_45 5544.43,7933.07 r0 top
KW5 "MGSHV-0_12-D1_3xd0.45" MGSHV-0_12-D1_3xd0_45 5544.43,7568.9 r0 top
KW6 "MGSHV-0_12-D1_3xd0.45" MGSHV-0_12-D1_3xd0_45 5544.43,8031.5 r0 top
KW7 "MGSHV-0_12-D1_3xd0.45" MGSHV-0_12-D1_3xd0_45 6046.4,7657.48 r0 top
KW8 "MGSHV-0_12-D1_3xd0.45" MGSHV-0_12-D1_3xd0_45 5544.43,7755.91 r0 top
KW9 "MGSHV-0_2-D1_6xd0.62_d1_7" MGSHV-0_2-D1_6xd0_62_d1_7 1646.79,7588.58 r90 top
KW10 "MGSHV-0_2-D1_6xd0.62_d1_7" MGSHV-0_2-D1_6xd0_62_d1_7 1646.79,8110.24 r270 top
L1 "SRF0905-100Y" SR0905 2227.5,6761.81 r270 top
L2 "NLFV32T-1R0M-EF" 1210-STANDART-3225 2916.48,6486.22 r0 top
L3 "NLFV32T-1R0M-EF" 1210-STANDART-3225 4402.7,6683.07 r180 top
L4 "NLFV32T-1R0M-EF" 1210-STANDART-3225 4884.98,6220.47 r0 top
L5 "NLFV32T-1R0M-EF" 1210-STANDART-3225 3792.46,6820.87 r180 top
L6 "NLFV32T-1R0M-EF" 1210-STANDART-3225 4589.71,6023.62 r0 top
L7 "NLFV32T-1R0M-EF" 1210-STANDART-3225 2247.19,6446.85 r0 top
L8 "SRP6540-220M" 6540_SRP_SERIES_7t5x6t5_H4 3920.42,5927.17 r180 top
R1 "CRM2512-FX-R100ELF" 2512-STANDART-6332 3487.35,11712.6 r275 top
R2 "CRM2512-FX-R100ELF" 2512-STANDART-6332 3310.18,11692.91 r275 top
R3 "CRM2512-FX-R100ELF" 2512-STANDART-6332 2070.02,11309.06 r300 top
R4 "CRM2512-FX-R100ELF" 2512-STANDART-6332 2217.66,11387.8 r300 top
R5 "CRM2512-FX-R100ELF" 2512-STANDART-6332 1105.46,10551.18 r325 top
R6 "CRM2512-FX-R100ELF" 2512-STANDART-6332 987.35,10403.54 r325 top
R7 "CRM2512-FX-R100ELF" 2512-STANDART-6332 416.48,9360.24 r340 top
R8 "CRM2512-FX-R100ELF" 2512-STANDART-6332 357.42,9202.76 r340 top
R9 "CRM2512-FX-R100ELF" 2512-STANDART-6332 209.79,7893.7 r7 top
R10 "CRM2512-FX-R100ELF" 2512-STANDART-6332 229.47,7726.38 r7 top
R11 "CRM2512-FX-R100ELF" 2512-STANDART-6332 544.43,6653.54 r27 top
R12 "CRM2512-FX-R100ELF" 2512-STANDART-6332 642.86,6466.54 r27 top
R13 "CRM2512-FX-R100ELF" 2512-STANDART-6332 1449.94,5452.76 r50 top
R14 "CRM2512-FX-R100ELF" 2512-STANDART-6332 1617.27,5305.12 r50 top
R15 "CRM2512-FX-R100ELF" 2512-STANDART-6332 2759,4714.57 r70 top
R16 "CRM2512-FX-R100ELF" 2512-STANDART-6332 2601.52,4773.62 r70 top
R17 "CRM2512-FX-R100ELF" 2512-STANDART-6332 4255.06,4596.46 r95 top
R18 "CRM2512-FX-R100ELF" 2512-STANDART-6332 4077.9,4576.77 r95 top
R19 "CRM2512-FX-R100ELF" 2512-STANDART-6332 5564.12,5029.53 r120 top
R20 "CRM2512-FX-R100ELF" 2512-STANDART-6332 5396.79,4940.94 r120 top
R21 "CRM2512-FX-R100ELF" 2512-STANDART-6332 6469.63,5777.56 r140 top
R22 "CRM2512-FX-R100ELF" 2512-STANDART-6332 6597.58,5915.35 r140 top
R23 "CRM2512-FX-R100ELF" 2512-STANDART-6332 7168.45,6938.98 r160 top
R24 "CRM2512-FX-R100ELF" 2512-STANDART-6332 7237.35,7106.3 r160 top
R25 "CRM2512-FX-R100ELF" 2512-STANDART-6332 7325.93,8631.89 r185 top
R26 "CRM2512-FX-R100ELF" 2512-STANDART-6332 7345.61,8464.57 r185 top
R27 "CRM2512-FX-R100ELF" 2512-STANDART-6332 7020.81,9704.72 r205 top
R28 "CRM2512-FX-R100ELF" 2512-STANDART-6332 6942.07,9881.89 r205 top
R29 "CRM2512-FX-R100ELF" 2512-STANDART-6332 6026.72,10974.41 r230 top
R30 "CRM2512-FX-R100ELF" 2512-STANDART-6332 6154.67,10866.14 r230 top
R31 "CRM2512-FX-R100ELF" 2512-STANDART-6332 4983.41,11525.59 r250 top
R32 "CRM2512-FX-R100ELF" 2512-STANDART-6332 4816.09,11584.65 r250 top
R33 "CRM2512-FX-R100ELF" 2512-STANDART-6332 4058.21,9744.09 r158 top
R34 "CRM2512-FX-R100ELF" 2512-STANDART-6332 4136.95,9921.26 r158 top
R35 "ERJ-8GEYJ203V" 1206-STANDART-3216 1951.91,6860.24 r180 top
R36 "ERJ-8GEYJ203V" 1206-STANDART-3216 2916.48,6328.74 r180 top
R37 "ERJ-8GEYJ203V" 1206-STANDART-3216 3221.6,6072.83 r270 top
R38 "ERJ-8GEYJ203V" 1206-STANDART-3216 2955.85,6092.52 r90 top
R39 "ERJ-8GEYJ203V" 1206-STANDART-3216 2818.05,6092.52 r90 top
R40 "ERJ-8GEYJ203V" 1206-STANDART-3216 3329.87,6072.83 r270 top
R41 "ERJ-3EKF4701V" 0603-STANDART-1608 3595.61,7519.69 r0 top
R42 "ERJ-3EKF4701V" 0603-STANDART-1608 3782.62,7519.69 r180 top
R43 "ERJ-3EKF4701V" 0603-STANDART-1608 3595.61,7588.58 r0 top
R44 "ERJ-3EKF4701V" 0603-STANDART-1608 3782.62,7588.58 r180 top
R45 "ERJ-3EKF4701V" 0603-STANDART-1608 3595.61,7657.48 r0 top
R46 "ERJ-3EKF4701V" 0603-STANDART-1608 3782.62,7657.48 r180 top
R47 "ERJ-3EKF4701V" 0603-STANDART-1608 3595.61,7736.22 r0 top
R48 "ERJ-3EKF4701V" 0603-STANDART-1608 3782.62,7736.22 r180 top
R49 "ERJ-3EKF4701V" 0603-STANDART-1608 4018.84,7480.31 r90 bottom
R50 "ERJ-3EKF4701V" 0603-STANDART-1608 3959.79,8553.15 r180 bottom
R51 "ERJ-3EKF4701V" 0603-STANDART-1608 3605.46,8622.05 r0 top locked
R52 "ERJ-3EKF4701V" 0603-STANDART-1608 3792.46,8622.05 r180 top locked
R53 "ERJ-3EKF4701V" 0603-STANDART-1608 3605.46,8690.94 r0 top locked
R54 "ERJ-3EKF4701V" 0603-STANDART-1608 3792.46,8690.94 r180 top locked
R55 "ERJ-3EKF4701V" 0603-STANDART-1608 3605.46,8759.84 r0 top locked
R56 "ERJ-3EKF4701V" 0603-STANDART-1608 3792.46,8759.84 r180 top locked
R57 "ERJ-3EKF4701V" 0603-STANDART-1608 3605.46,8828.74 r0 top locked
R58 "ERJ-3EKF4701V" 0603-STANDART-1608 3792.46,8828.74 r180 top locked
R59 "ERJ-3EKF4701V" 0603-STANDART-1608 3881.05,8917.32 r90 bottom
R60 "ERJ-3EKF4701V" 0603-STANDART-1608 3733.41,7814.96 r180 bottom
R61 "ERJ-3EKF4701V" 0603-STANDART-1608 3182.23,8464.57 r270 bottom
R62 "ERJ-3EKF4701V" 0603-STANDART-1608 2355.46,7224.41 r90 bottom
R63 "ERJ-3EKF4701V" 0603-STANDART-1608 2355.46,7362.2 r90 bottom
R64 "ERJ-3EKF4701V" 0603-STANDART-1608 2168.45,7460.63 r90 bottom
R65 "ERJ-3EKF4701V" 0603-STANDART-1608 2168.45,7598.43 r90 bottom
R66 "ERJ-3EKF4701V" 0603-STANDART-1608 2276.72,8553.15 r90 bottom
R67 "ERJ-3EKF4701V" 0603-STANDART-1608 2276.72,8690.94 r90 bottom
R68 "ERJ-3EKF4701V" 0603-STANDART-1608 2276.72,8828.74 r90 bottom
R69 "ERJ-3EKF4701V" 0603-STANDART-1608 2276.72,8966.54 r90 bottom
R70 "ERJ-3EKF4701V" 0603-STANDART-1608 2266.87,9104.33 r90 bottom
R71 "ERJ-3EKF4701V" 0603-STANDART-1608 2266.87,9232.28 r90 bottom
R72 "ERJ-3EKF4701V" 0603-STANDART-1608 2168.45,9370.08 r90 bottom
R73 "ERJ-3EKF4701V" 0603-STANDART-1608 2168.45,9507.87 r90 bottom
R74 "ERJ-3EKF4701V" 0603-STANDART-1608 2276.72,7736.22 r90 bottom
R75 "ERJ-3EKF4701V" 0603-STANDART-1608 2276.72,7874.02 r90 bottom
R76 "ERJ-3EKF4701V" 0603-STANDART-1608 2276.72,8011.81 r90 bottom
R77 "ERJ-3EKF4701V" 0603-STANDART-1608 2276.72,8149.61 r90 bottom
R78 "ERJ-3EKF4701V" 0603-STANDART-1608 2276.72,8287.4 r90 bottom
R79 "ERJ-3EKF4701V" 0603-STANDART-1608 2276.72,8415.35 r90 bottom
R80 "ERJ-3EKF4701V" 0603-STANDART-1608 3201.91,8179.13 r0 bottom
R81 "ERJ-3EKF4701V" 0603-STANDART-1608 3024.75,8464.57 r180 bottom
R82 "ERJ-3EKF4701V" 0603-STANDART-1608 2995.22,8257.87 r180 bottom
R83 "ERJ-3EKF4701V" 0603-STANDART-1608 3270.81,8464.57 r270 bottom
R84 "ERJ-3EKF4701V" 0603-STANDART-1608 5071.99,6870.08 r270 bottom
R85 "ERJ-3EKF4701V" 0603-STANDART-1608 5406.64,6446.85 r270 top
R86 "ERJ-3EKF4701V" 0603-STANDART-1608 4048.37,6269.69 r90 top
R87 "ERJ-3EKF4701V" 0603-STANDART-1608 3595.61,6781.5 r0 top
R88 "ERJ-3EKF4701V" 0603-STANDART-1608 4953.88,6171.26 r180 bottom
R89 "ERJ-3EKF4701V" 0603-STANDART-1608 5003.09,8188.98 r90 bottom
R90 "ERJ-3EKF4701V" 0603-STANDART-1608 4934.2,8188.98 r90 bottom
R91 "ERJ-3EKF4701V" 0603-STANDART-1608 4786.56,8397.8 r0 bottom
R92 "ERJ-3EKF4701V" 0603-STANDART-1608 5062.15,8562.99 r180 bottom
R93 "ERJ-3EKF4701V" 0603-STANDART-1608 4491.28,8671.26 r180 bottom
R94 "ERJ-3EKF4701V" 0603-STANDART-1608 4648.76,8405.51 r90 bottom
R95 "ERJ-3EKF4701V" 0603-STANDART-1608 5190.1,8385.83 r90 bottom
R96 "ERJ-3EKF4701V" 0603-STANDART-1608 5898.76,8385.83 r0 bottom
R97 "ERJ-3EKF4701V" 0603-STANDART-1608 5642.86,8385.83 r0 bottom
R98 "ERJ-3EKF4701V" 0603-STANDART-1608 4442.07,7273.62 r0 bottom
R99 "ERJ-3EKF4701V" 0603-STANDART-1608 4314.12,7834.65 r180 bottom
R100 "ERJ-3EKF4701V" 0603-STANDART-1608 4589.71,8395.67 r90 bottom
R101 "ERJ-3EKF4701V" 0603-STANDART-1608 4983.41,8671.26 r90 bottom
R102 "ERJ-3EKF4701V" 0603-STANDART-1608 5288.53,9488.19 r180 bottom
R103 "ERJ-3EKF4701V" 0603-STANDART-1608 3694.04,9596.46 r270 bottom
R104 "MCR25JZHJ000" 1210-STANDART-3225 2660.57,6850.39 r0 top
R105 "MCR25JZHJ000" 1210-STANDART-3225 2109.39,8769.68 r0 top
R106 "MCR25JZHJ000" 1210-STANDART-3225 5199.94,8179.13 r0 top
R107 "MCR25JZHJ000" 1210-STANDART-3225 2109.39,8622.05 r0 top
R108 "ERJ-3EKF6200V" 0603-STANDART-1608 2493.25,7194.88 r180 top
R109 "ERJ-3EKF6200V" 0603-STANDART-1608 2493.25,7293.31 r180 top
R110 "ERJ-3EKF6200V" 0603-STANDART-1608 2493.25,7401.57 r180 top
R111 "ERJ-3EKF6200V" 0603-STANDART-1608 2493.25,7509.84 r180 top
R112 "ERJ-3EKF6200V" 0603-STANDART-1608 2424.35,8582.68 r180 top
R113 "ERJ-3EKF6200V" 0603-STANDART-1608 2424.35,8769.68 r180 top
R114 "ERJ-3EKF6200V" 0603-STANDART-1608 2424.35,8828.74 r180 top
R115 "ERJ-3EKF6200V" 0603-STANDART-1608 2424.35,8927.17 r180 top
R116 "ERJ-3EKF6200V" 0603-STANDART-1608 2424.35,9124.02 r180 top
R117 "ERJ-3EKF6200V" 0603-STANDART-1608 2424.35,9222.44 r180 top
R118 "ERJ-3EKF6200V" 0603-STANDART-1608 2424.35,9320.87 r180 top
R119 "ERJ-3EKF6200V" 0603-STANDART-1608 2424.35,9409.45 r180 top
R120 "ERJ-3EKF6200V" 0603-STANDART-1608 2424.35,7647.64 r180 top
R121 "ERJ-3EKF6200V" 0603-STANDART-1608 2424.35,7785.43 r180 top
R122 "ERJ-3EKF6200V" 0603-STANDART-1608 2424.35,7893.7 r180 top
R123 "ERJ-3EKF6200V" 0603-STANDART-1608 2424.35,8041.34 r180 top
R124 "ERJ-3EKF6200V" 0603-STANDART-1608 2424.35,8336.61 r180 top
R125 "ERJ-3EKF6200V" 0603-STANDART-1608 2424.35,8415.35 r180 top
R126 "ERJ-3EKF6200V" 0603-STANDART-1608 3073.96,10374.02 r197.5 bottom
R127 "ERJ-3EKF6200V" 0603-STANDART-1608 2325.93,9960.63 r220 bottom
R128 "ERJ-3EKF6200V" 0603-STANDART-1608 1725.53,9202.76 r240 bottom
R129 "ERJ-3EKF6200V" 0603-STANDART-1608 1479.47,8405.51 r260 bottom
R130 "ERJ-3EKF6200V" 0603-STANDART-1608 1568.05,7431.1 r285 bottom
R131 "ERJ-3EKF6200V" 0603-STANDART-1608 1991.28,6702.76 r305 bottom
R132 "ERJ-3EKF6200V" 0603-STANDART-1608 2680.26,6112.2 r330 bottom
R133 "ERJ-3EKF6200V" 0603-STANDART-1608 3546.4,5836.61 r355 bottom
R134 "ERJ-3EKF6200V" 0603-STANDART-1608 4648.76,5964.57 r15 bottom
R135 "ERJ-3EKF6200V" 0603-STANDART-1608 5278.68,6368.11 r40 bottom
R136 "ERJ-3EKF6200V" 0603-STANDART-1608 5888.92,7125.98 r60 bottom
R137 "ERJ-3EKF6200V" 0603-STANDART-1608 6115.3,7952.76 r80 bottom
R138 "ERJ-3EKF6200V" 0603-STANDART-1608 5997.19,8917.32 r105 bottom
R139 "ERJ-3EKF6200V" 0603-STANDART-1608 5564.12,9675.2 r125 bottom
R140 "ERJ-3EKF6200V" 0603-STANDART-1608 4865.3,10246.06 r330 bottom
R141 "ERJ-3EKF6200V" 0603-STANDART-1608 3802.31,10462.6 r170 bottom
R142 "ERJ-3EKF6200V" 0603-STANDART-1608 5780.65,8897.64 r0 bottom
R143 "ERJ-3EKF6200V" 0603-STANDART-1608 5573.96,8789.37 r90 bottom
R144 "ERJ-3EKF6200V" 0603-STANDART-1608 2394.83,7076.77 r90 bottom
R145 "ERJ-3EKF6200V" 0603-STANDART-1608 5180.26,8671.26 r90 bottom
R146 "ERJ-3EKF6200V" 0603-STANDART-1608 5888.92,8641.73 r270 bottom
R147 "ERJ-3EKF6200V" 0603-STANDART-1608 5593.64,8641.73 r270 bottom
R148 "ERJ-3EKF6200V" 0603-STANDART-1608 5938.13,8011.81 r0 top
R149 "ERJ-3EKF6200V" 0603-STANDART-1608 5938.13,7913.39 r180 top
R150 "ERJ-3EKF6190V" 0603-STANDART-1608 5022.78,7214.57 r0 bottom
R151 "ERJ-3EKF6190V" 0603-STANDART-1608 5012.94,7312.99 r0 bottom
R152 "ERJ-3EKF6190V" 0603-STANDART-1608 5012.94,7401.57 r0 bottom
R153 "ERJ-3EKF6190V" 0603-STANDART-1608 5012.94,7490.16 r0 bottom
R154 "ERJ-3EKF6190V" 0603-STANDART-1608 5012.94,7588.58 r0 bottom
R155 "ERJ-3EKF6190V" 0603-STANDART-1608 4993.25,7716.54 r0 bottom
R156 "ERJ-3EKF6190V" 0603-STANDART-1608 4993.25,7834.65 r0 bottom
R157 "ERJ-3EKF6190V" 0603-STANDART-1608 4993.25,7942.91 r0 bottom
R158 "ERJ-3EKF6190V" 0603-STANDART-1608 4865.3,7263.78 r0 bottom
R159 "ERJ-3EKF6190V" 0603-STANDART-1608 4865.3,7352.36 r0 bottom
R160 "ERJ-3EKF6190V" 0603-STANDART-1608 4865.3,7440.94 r0 bottom
R161 "ERJ-3EKF6190V" 0603-STANDART-1608 4865.3,7529.53 r0 bottom
R162 "ERJ-3EKF6190V" 0603-STANDART-1608 4845.61,7667.32 r0 bottom
R163 "ERJ-3EKF6190V" 0603-STANDART-1608 4855.46,7775.59 r0 bottom
R164 "ERJ-3EKF6190V" 0603-STANDART-1608 4855.46,7883.86 r0 bottom
R165 "ERJ-3EKF6190V" 0603-STANDART-1608 4855.46,7972.44 r0 bottom
R166 "ERJ-3EKF2000V" 0603-STANDART-1608 5603.49,7480.31 r0 top
R167 "ERJ-3EKF2000V" 0603-STANDART-1608 5603.49,7411.42 r0 top
R168 "ERJ-3EKF2000V" 0603-STANDART-1608 5573.96,7834.65 r0 top
R169 "ERJ-3EKF2000V" 0603-STANDART-1608 5928.29,7519.69 r180 top
R170 "ERJ-3EKF2000V" 0603-STANDART-1608 5820.02,8238.19 r270 top
R171 "ERJ-3EKF2000V" 0603-STANDART-1608 5731.44,8238.19 r270 top
R172 "ERJ-3EKF2000V" 0603-STANDART-1608 5898.76,8238.19 r270 top
R173 "ERJ-3EKF2000V" 0603-STANDART-1608 4845.61,9124.02 r0 bottom
R174 "ERJ-3EKF2000V" 0603-STANDART-1608 3142.86,10157.48 r180 bottom
R175 "ERJ-3GEY0R00V" 0603-STANDART-1608 2759,8385.83 r0 bottom
R176 "ERJ-3GEY0R00V" 0603-STANDART-1608 4294.43,7627.95 r270 bottom
R177 "ERJ-3GEY0R00V" 0603-STANDART-1608 4314.12,8592.52 r90 bottom
R178 "ERJ-3GEY0R00V" 0603-STANDART-1608 2759,8454.72 r0 bottom
R179 "ERJ-3GEY0R00V" 0603-STANDART-1608 3566.09,7470.47 r0 bottom
R180 "ERJ-3GEY0R00V" 0603-STANDART-1608 3516.87,8582.68 r180 bottom locked
R181 "ERJ-3GEY0R00V" 0603-STANDART-1608 3398.76,8425.2 r270 bottom
R182 "ERJ-3GEY0R00V" 0603-STANDART-1608 3329.87,8464.57 r270 bottom
R183 "ERJ-3GEY0R00V" 0603-STANDART-1608 2001.13,8129.92 r90 bottom
R184 "ERJ-3GEY0R00V" 0603-STANDART-1608 2070.02,8129.92 r90 bottom
R185 "ERJ-3GEY0R00V" 0603-STANDART-1608 5229.47,8562.99 r180 bottom
R186 "ERJ-3GEY0R00V" 0603-STANDART-1608 2089.71,8887.8 r180 top
R187 "ERJ-3GEY0R00V" 0603-STANDART-1608 4737.35,7244.09 r90 bottom
R188 "ERJ-3GEY0R00V" 0603-STANDART-1608 4609.39,7883.86 r180 bottom
R189 "ERJ-3GEY0R00V" 0603-STANDART-1608 5573.96,7677.17 r0 top
R190 "ERJ-3GEY0R00V" 0603-STANDART-1608 5947.98,7450.79 r180 top
R191 "ERJ-3GEY0R00V" 0603-STANDART-1608 1646.79,7480.31 r90 top
R192 "ERJ-3GEY0R00V" 0603-STANDART-1608 1646.79,8218.5 r270 top
R193 "ERJ-3GEY0R00V" 0603-STANDART-1608 4461.76,9301.18 r0 bottom
R194 "ERJ-3GEY0R00V" 0603-STANDART-1608 4461.76,9183.07 r0 bottom
R195 "ERJ-3GEY0R00V" 0603-STANDART-1608 4510.97,8907.48 r180 bottom
R196 "ERJ-3GEY0R00V" 0603-STANDART-1608 3162.54,9950.79 r0 bottom
R197 "ERJ-3GEY0R00V" 0603-STANDART-1608 2680.26,9842.52 r180 bottom
R198 "ERJ-3GEY0R00V" 0603-STANDART-1608 2680.26,9960.63 r180 bottom
R199 "ERJ-3GEY0R00V" 0603-STANDART-1608 5101.52,9094.49 r270 top
R200 "ERJ-3GEY0R00V" 0603-STANDART-1608 5003.09,9114.17 r270 top
R201 "ERJ-3GEY0R00V" 0603-STANDART-1608 4835.77,9094.49 r270 top
R202 "ERJ-3EKF10R7V" 0603-STANDART-1608 3487.35,6023.62 r270 top
R203 "ERJ-3EKF10R7V" 0603-STANDART-1608 4560.18,6358.27 r90 top
R204 "ERJ-3EKF10R7V" 0603-STANDART-1608 3772.78,9458.66 r0 bottom
R205 "ERJ-3EKF10R7V" 0603-STANDART-1608 5111.36,9271.65 r270 bottom
R206 "ERJ-3EKF10R7V" 0603-STANDART-1608 3428.29,9685.04 r0 bottom
R207 "ERJ-3EKF1022V" 0603-STANDART-1608 3920.42,9468.5 r90 bottom
R208 "ERJ-3EKF1022V" 0603-STANDART-1608 4205.85,9498.03 r180 bottom
R209 "ERJ-3EKF1022V" 0603-STANDART-1608 4461.76,9419.29 r180 bottom
R210 "ERJ-3EKF1022V" 0603-STANDART-1608 4432.23,9360.24 r180 bottom
R211 "ERJ-3EKF1022V" 0603-STANDART-1608 4461.76,9055.12 r0 bottom
R212 "ERJ-3EKF1022V" 0603-STANDART-1608 3969.63,9124.02 r0 bottom
R213 "ERJ-3EKF1022V" 0603-STANDART-1608 2591.68,10059.06 r90 bottom
R214 "ERJ-3EKF1022V" 0603-STANDART-1608 2729.47,10059.06 r270 bottom
R215 "ERJ-3EKF1022V" 0603-STANDART-1608 2926.32,10137.8 r180 bottom
R216 "ERJ-3EKF1022V" 0603-STANDART-1608 2965.69,9645.67 r90 bottom
R217 "ERJ-3EKF1022V" 0603-STANDART-1608 3172.39,10049.21 r270 bottom
R218 "ERJ-3EKF1022V" 0603-STANDART-1608 3969.63,9183.07 r0 bottom
R219 "ERJ-3EKF1022V" 0603-STANDART-1608 4323.96,8946.85 r0 bottom
R220 "ERJ-3EKF1022V" 0603-STANDART-1608 3162.54,9832.68 r180 bottom
R221 "ERJ-3EKF1022V" 0603-STANDART-1608 3241.28,9704.72 r270 bottom
R222 "ERJ-3EKF1022V" 0603-STANDART-1608 5062.15,9173.23 r0 bottom
R223 "ERJ-3EKF1022V" 0603-STANDART-1608 5062.15,9045.28 r0 bottom
R224 "ERJ-3EKF1022V" 0603-STANDART-1608 3428.29,9547.24 r0 bottom
R225 "ERJ-3EKF1022V" 0603-STANDART-1608 3733.41,9793.31 r90 bottom
R226 "ERJ-3EKF2052V" 0603-STANDART-1608 4707.82,9163.39 r180 bottom
R227 "ERJ-3EKF2052V" 0603-STANDART-1608 4461.76,9124.02 r0 bottom
R228 "ERJ-3EKF2052V" 0603-STANDART-1608 4323.96,9005.91 r0 bottom
R229 "ERJ-3EKF2052V" 0603-STANDART-1608 2709.79,9744.09 r90 bottom
R230 "ERJ-3EKF2052V" 0603-STANDART-1608 4619.24,9202.76 r90 bottom
R231 "ERJ-3EKF2052V" 0603-STANDART-1608 2571.99,9812.99 r90 bottom
R232 "ERJ-3EKF2052V" 0603-STANDART-1608 4038.53,9468.5 r270 bottom
R233 "ERJ-3EKF2052V" 0603-STANDART-1608 3969.63,9360.24 r0 bottom
R234 "CRCW251222K0JNEG" 2512-STANDART-6332 3625.14,10364.17 r270 top
R235 "CRCW251222K0JNEG" 2512-STANDART-6332 3359.39,10226.38 r197 top locked
R236 "CRCW251222K0JNEG" 2512-STANDART-6332 3300.34,10413.39 r17 top locked
R237 "CRCW251222K0JNEG" 2512-STANDART-6332 3005.06,10698.82 r197 top
R238 "CRCW251222K0JNEG" 2512-STANDART-6332 2946.01,10885.83 r17 top
R239 "ERJ-14NF51R1U" 1210-STANDART-3225 3684.2,10019.68 r90 bottom
R240 "ERJ-3EKF3403V" 0603-STANDART-1608 5239.31,8996.06 r0 bottom
R241 "ERJ-3EKF3403V" 0603-STANDART-1608 3536.56,9911.42 r180 bottom
R242 "ERJ-3EKF10R0V" 0603-STANDART-1608 3674.35,7913.39 r180 bottom
R243 "ERJ-3EKF10R0V" 0603-STANDART-1608 3585.77,9389.76 r180 bottom
R244 "ERJ-3EKF10R0V" 0603-STANDART-1608 3674.35,9163.39 r0 bottom
R245 "ERJ-3EKF10R0V" 0603-STANDART-1608 4786.56,8464.57 r0 bottom
R246 "ERJ-3EKF10R0V" 0603-STANDART-1608 5347.58,8366.14 r270 bottom
R247 "ERJ-3EKF10R0V" 0603-STANDART-1608 3566.09,9547.24 r180 bottom
R248 "ERJ-3EKF10R0V" 0603-STANDART-1608 5327.9,8907.48 r180 bottom
R249 "ERJ-3EKF10R0V" 0603-STANDART-1608 4934.2,8966.54 r0 bottom
R250 "ERJ-3EKF10R0V" 0603-STANDART-1608 4934.2,8907.48 r0 bottom
R251 "ERJ-3EKF10R0V" 0603-STANDART-1608 2847.58,9645.67 r270 bottom
R252 "ERJ-3EKF10R0V" 0603-STANDART-1608 2906.64,9645.67 r270 bottom
R253 "ERJ-3EKF2100V" 0603-STANDART-1608 5062.15,9104.33 r180 bottom
R254 "ERJ-3EKF2100V" 0603-STANDART-1608 3664.51,9793.31 r90 bottom
R255 "ERJ-3EKF5362V" 0603-STANDART-1608 3999.16,9025.59 r90 bottom
R256 "ERJ-3EKF5362V" 0603-STANDART-1608 3093.64,9704.72 r90 bottom
R257 "ERJ-3EKF3401V" 0603-STANDART-1608 4471.6,6358.27 r270 top
R258 "ERJ-6GEYJ471V" 0805-STANDART-2012 5288.53,8484.25 r180 bottom
R259 "ERJ-6ENF2401V" 0805-STANDART-2012 5052.31,8671.26 r90 bottom
S1 "7914G-1-000E" 7914G 3477.5,8218.5 r270 bottom
S2 "7914G-1-000E" 7914G 4018.84,8385.83 r270 bottom locked
TP1 "5011" TEST-POINTS-1 3871.2,11663.39 r0 bottom
TP2 "5011" TEST-POINTS-1 7276.72,8080.71 r0 bottom
TP3 "5011" TEST-POINTS-1 308.21,8267.72 r0 bottom
TP4 "5011" TEST-POINTS-1 3723.57,4675.2 r0 bottom
TP5 "5011" TEST-POINTS-1 2276.72,7086.61 r0 bottom
TP6 "5010" TEST-POINTS-1 4757.03,6082.68 r0 bottom
TP7 "5010" TEST-POINTS-1 2886.95,6781.5 r0 bottom
TP8 "5010" TEST-POINTS-1 4904.67,6742.13 r0 bottom
TP9 "5010" TEST-POINTS-1 5367.27,6811.02 r0 bottom
TP10 "5010" TEST-POINTS-1 1725.53,7421.26 r0 bottom
TP11 "5125" TEST-POINTS-1 4304.27,9744.09 r0 bottom
TP12 "5125" TEST-POINTS-1 3684.2,11643.7 r0 bottom locked
TP13 "5125" TEST-POINTS-1 2404.67,11368.11 r0 bottom
TP14 "5125" TEST-POINTS-1 1321.99,10620.08 r0 bottom
TP15 "5125" TEST-POINTS-1 564.12,9478.35 r0 bottom
TP16 "5125" TEST-POINTS-1 308.21,8070.87 r0 bottom
TP17 "5125" TEST-POINTS-1 564.12,6830.71 r0 bottom
TP18 "5125" TEST-POINTS-1 1321.99,5698.82 r0 bottom
TP19 "5125" TEST-POINTS-1 2493.25,4921.26 r0 bottom
TP20 "5125" TEST-POINTS-1 3910.57,4675.2 r0 bottom
TP21 "5125" TEST-POINTS-1 5170.42,4940.94 r0 bottom
TP22 "5125" TEST-POINTS-1 6253.09,5698.82 r0 bottom
TP23 "5125" TEST-POINTS-1 7010.97,6811.02 r0 bottom
TP24 "5125" TEST-POINTS-1 7276.72,8267.72 r0 bottom
TP25 "5125" TEST-POINTS-1 7010.97,9498.03 r0 bottom
TP26 "5125" TEST-POINTS-1 6233.41,10669.29 r0 top
TP27 "5125" TEST-POINTS-1 5131.05,11377.95 r0 bottom
TP28 "5125" TEST-POINTS-1 3684.2,7017.72 r0 bottom
TP29 "5126" TEST-POINTS-1 3487.35,10009.84 r0 bottom
TP30 "5126" TEST-POINTS-1 5209.79,6505.91 r0 bottom
TP31 "5126" TEST-POINTS-1 3890.89,7874.02 r0 bottom
TP32 "5126" TEST-POINTS-1 5406.64,9537.4 r0 bottom
TP33 "5013" TEST-POINTS-1 3113.33,11584.65 r0 bottom
TP34 "5013" TEST-POINTS-1 5298.37,9773.62 r0 bottom
TP35 "5013" TEST-POINTS-1 1922.38,11102.36 r0 top
TP36 "5013" TEST-POINTS-1 888.92,10078.74 r0 bottom
TP37 "5013" TEST-POINTS-1 406.64,8956.69 r0 bottom
TP38 "5013" TEST-POINTS-1 367.27,7490.16 r0 bottom
TP39 "5013" TEST-POINTS-1 859.39,6289.37 r0 bottom
TP40 "5013" TEST-POINTS-1 1853.49,5255.91 r0 bottom
TP41 "5013" TEST-POINTS-1 3034.59,4753.94 r0 bottom
TP42 "5013" TEST-POINTS-1 4481.44,4744.09 r0 bottom
TP43 "5013" TEST-POINTS-1 5672.39,5226.38 r0 bottom
TP44 "5013" TEST-POINTS-1 6676.32,6190.94 r0 bottom
TP45 "5013" TEST-POINTS-1 7188.13,7401.57 r0 bottom
TP46 "5013" TEST-POINTS-1 7207.82,8838.58 r0 bottom
TP47 "5013" TEST-POINTS-1 6735.38,10029.53 r0 bottom
TP48 "5013" TEST-POINTS-1 5760.97,11043.31 r0 bottom
TP49 "5013" TEST-POINTS-1 4550.34,11564.96 r0 bottom
V1 "STPS3L60U" SMB-ST 2611.36,6673.23 r180 top
V2 "STPS3L60U" SMB-ST 3890.89,6210.63 r90 top
V3 "STPS3L60U" SMB-ST 4668.45,6633.86 r0 top
V4 "STPS3L60U" SMB-ST 4697.98,6387.8 r90 top
V5 "UDZSTE-175.1B" SOD323F_SC90 3418.45,6023.62 r90 top
V6 "1N4148W-7-F" SOD123-DIODES 4579.87,6476.38 r90 bottom
V7 "1N4148W-7-F" SOD123-DIODES 3103.49,7165.35 r180 top
V8 "1N4148W-7-F" SOD123-DIODES 4402.7,9488.19 r180 bottom
V9 "1N4148W-7-F" SOD123-DIODES 4579.87,9399.61 r270 bottom
V10 "1N4148W-7-F" SOD123-DIODES 4176.32,9015.75 r90 bottom
V11 "1N4148W-7-F" SOD123-DIODES 3300.34,9872.05 r270 bottom
V12 "PTVS45VP1UP,115" RTVSxP1UP 2424.35,6299.21 r180 top
V13 "PTVS3V3P1UP,115" RTVSxP1UP 4904.67,6870.08 r180 top
V14 "PTVS3V3P1UP,115" RTVSxP1UP 2591.68,7076.77 r0 top locked
V15 "PTVS3V3P1UP,115" RTVSxP1UP 4904.67,7027.56 r0 top
V16 "PTVS3V3P1UP,115" RTVSxP1UP 4264.9,5925.2 r90 top
V17 "UDZSTE-173.0B" SOD323F_SC90 5426.32,8484.25 r0 bottom
X1 "0039301040" 2Rx4K_ANGLE 3516.87,10826.77 r7 bottom locked